# Altium PCB ledcube_v2.PcbDoc (part 7 of 18)
Units mil, origin at the board's own origin, x right, y up, seen from the top; angles counter-clockwise.
Board outline 3130 x 3300 mil, 2 copper layers (Top Layer, Bottom Layer); 188 components, 216 nets, 29515 pads, 250 vias.
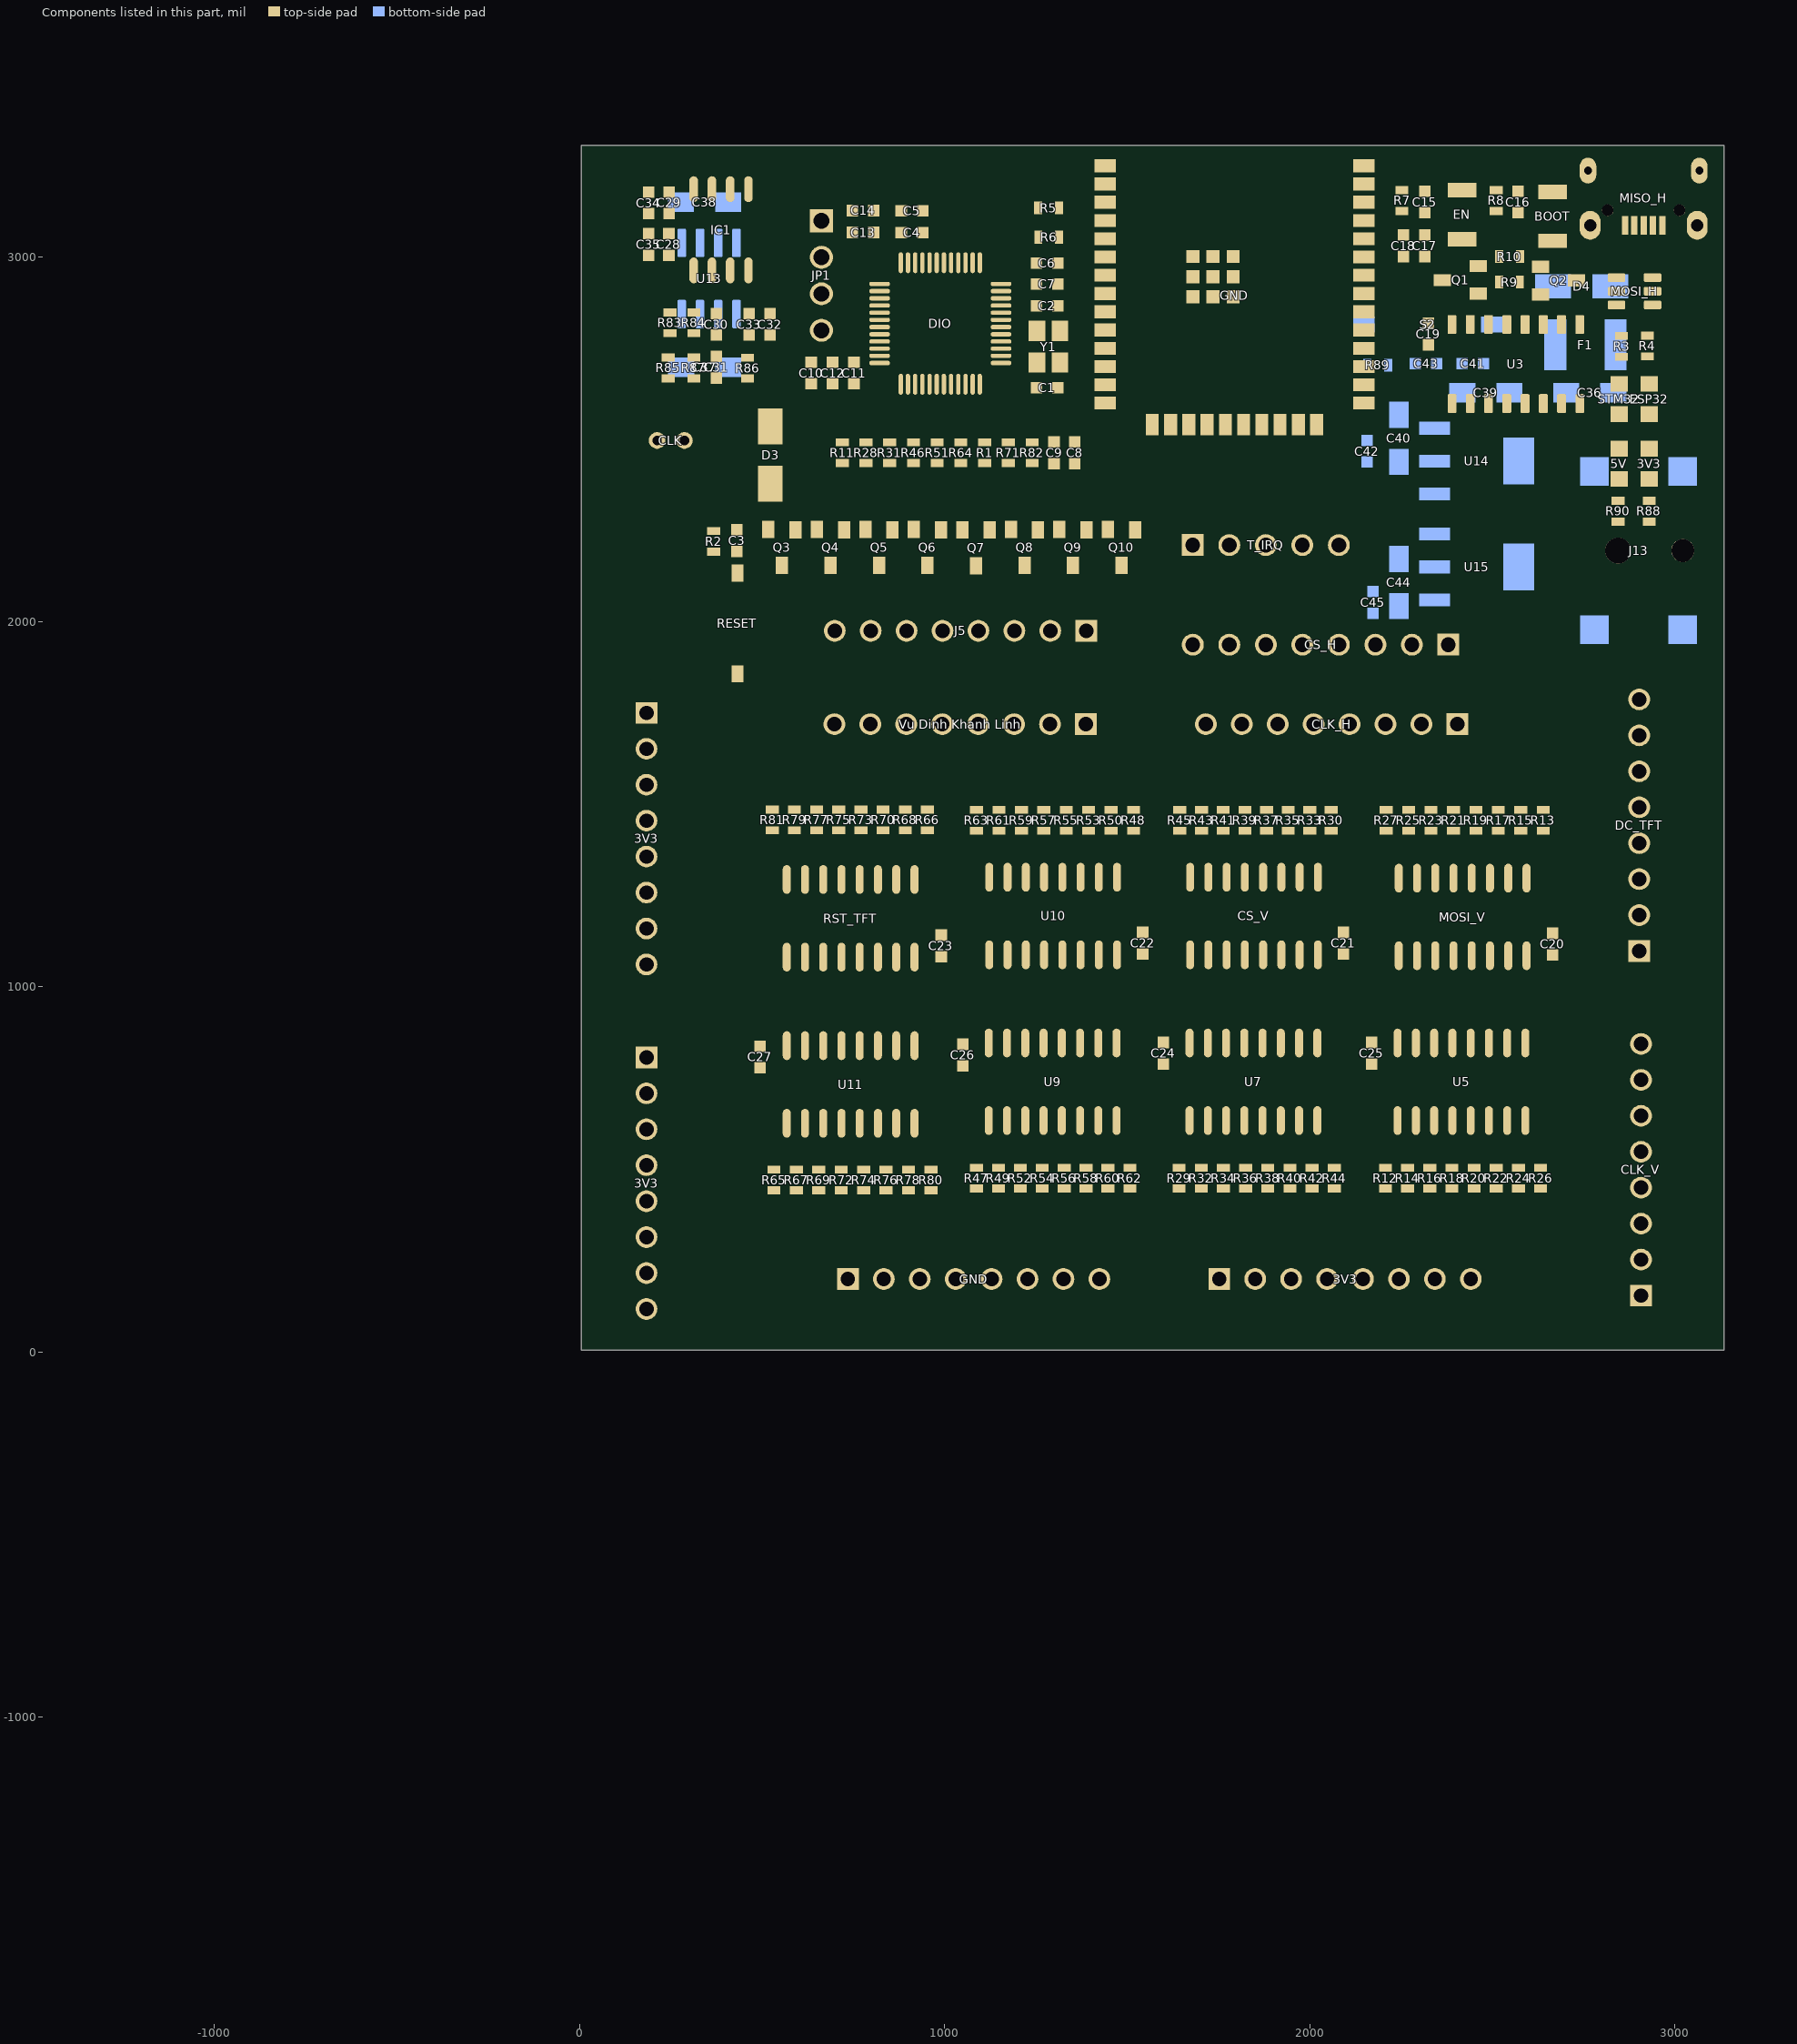
[diagram p6: the components of this part, seen from the top]

## Free pads (board coordinates) (continued)
  round 0.01 on Mech3: 1(-1371.24,-1735.99) 1(-1371.24,-1735.99) 1(-1371.24,-1735.67) 1(-1371.24,-1735.67) 1(-1371.24,-1737.75) 1(-1371.24,-1737.75) 1(-1371.24,-1737.73) 1(-1371.24,-1737.73) 1(-1371.24,-1737.84) 1(-1371.24,-1737.84) 1(-1371.24,-1737.81) 1(-1371.24,-1737.76) 1(-1371.23,-1735.66) 1(-1371.23,-1735.45) 1(-1371.23,-1735.41) 1(-1371.23,-1735.41) 1(-1371.23,-1737.68) 1(-1371.23,-1737.68) 1(-1371.23,-1737.63) 1(-1371.23,-1737.47) 1(-1371.23,-1737.47) 1(-1371.23,-1737.41) 1(-1371.23,-1737.08) 1(-1371.23,-1737.3) 1(-1371.23,-1737.3) 1(-1371.23,-1737.3) 1(-1371.23,-1736.55) 1(-1371.23,-1736.55) 1(-1371.23,-1737.17) 1(-1371.23,-1737.17) 1(-1371.23,-1737.08) 1(-1371.23,-1737.08) 1(-1371.23,-1736.86) 1(-1371.23,-1736.86) 1(-1371.23,-1736.83) 1(-1371.23,-1736.78) 1(-1371.23,-1736.75) 1(-1371.23,-1736.75) 1(-1371.23,-1737.3) 1(-1371.23,-1737.3) 1(-1371.23,-1737.17) 1(-1371.23,-1737.17) 1(-1371.23,-1736.96) 1(-1371.23,-1736.93) 1(-1371.23,-1736.93) 1(-1371.22,-1737.05) 1(-1371.22,-1737.05) 1(-1371.22,-1738.05) 1(-1371.22,-1738.05) 1(-1371.22,-1735.2) 1(-1371.22,-1735.2) 1(-1371.22,-1735.18) 1(-1371.22,-1735.18) 1(-1371.22,-1736.54) 1(-1371.22,-1736.61) 1(-1371.22,-1736.61) 1(-1371.21,-1735.25) 1(-1371.21,-1735.25) 1(-1371.21,-1735.22) 1(-1371.21,-1735.22) 1(-1371.21,-1735.61) 1(-1371.21,-1735.61) 1(-1371.21,-1735.38) 1(-1371.21,-1735.38) 1(-1371.21,-1735.3) 1(-1371.21,-1735.3) 1(-1371.21,-1735.08) 1(-1371.21,-1735.08) 1(-1371.21,-1737.3) 1(-1371.21,-1737.3) 1(-1371.21,-1735.21) 1(-1371.21,-1735.21) 1(-1371.21,-1735.08) 1(-1371.2,-1737.93) 1(-1371.2,-1737.93) 1(-1371.2,-1735.5) 1(-1371.2,-1735.5) 1(-1371.2,-1735.29) 1(-1371.2,-1735.29) 1(-1371.19,-1738.05) 1(-1371.19,-1738.05) 1(-1371.19,-1735.4) 1(-1371.19,-1735.4) 1(-1371.19,-1735.66) 1(-1371.19,-1735.66) 1(-1371.19,-1735.63) 1(-1371.19,-1735.63) 1(-1371.19,-1737.52) 1(-1371.19,-1737.52) 1(-1371.18,-1735.66) 1(-1371.18,-1737.69) 1(-1371.18,-1737.69) 1(-1371.18,-1737.63) 1(-1371.18,-1737.41) 1(-1371.18,-1737.32) 1(-1371.18,-1737.32) 1(-1371.18,-1738.06) 1(-1371.18,-1736.96) 1(-1371.18,-1736.96) 1(-1371.18,-1736.91) 1(-1371.18,-1736.91) 1(-1371.18,-1736.64) 1(-1371.18,-1736.64) 1(-1371.18,-1737.17) 1(-1371.18,-1737.09) 1(-1371.18,-1737.09) 1(-1371.18,-1736.96) 1(-1371.18,-1737.75) 1(-1371.18,-1737.75) 1(-1371.18,-1737.73) 1(-1371.18,-1737.73) 1(-1371.18,-1735.58) 1(-1371.18,-1735.58) 1(-1371.17,-1736.38) 1(-1371.17,-1736.38) 1(-1371.17,-1736.02) 1(-1371.17,-1736.02) 1(-1371.17,-1737.84) 1(-1371.17,-1737.84) 1(-1371.17,-1737.81) 1(-1371.17,-1737.76) 1(-1371.17,-1736.87) 1(-1371.17,-1736.87) 1(-1371.17,-1736.83) 1(-1371.17,-1736.78) 1(-1371.17,-1736.74) 1(-1371.17,-1736.74) 1(-1371.16,-1735.36) 1(-1371.16,-1737.91) 1(-1371.16,-1737.91) 1(-1371.16,-1735.36) 1(-1371.16,-1735.36) 1(-1371.16,-1735.34) 1(-1371.16,-1735.34) 1(-1371.16,-1737.71) 1(-1371.16,-1737.71) 1(-1371.16,-1735.29) 1(-1371.16,-1735.29) 1(-1371.15,-1735.4) 1(-1371.15,-1735.4) 1(-1371.15,-1735.33) 1(-1371.15,-1735.33) 1(-1371.15,-1736.66) 1(-1371.15,-1736.66) 1(-1371.14,-1735.27) 1(-1371.14,-1735.27) 1(-1371.14,-1735.27) 1(-1371.14,-1735.27) 1(-1371.14,-1735.04) 1(-1371.14,-1735.04) 1(-1371.14,-1735.44) 1(-1371.14,-1735.44) 1(-1371.14,-1735.41) 1(-1371.14,-1735.41) 1(-1371.14,-1737.32) 1(-1371.14,-1735.26) 1(-1371.14,-1735.26) 1(-1371.14,-1737.41) 1(-1371.14,-1737.41) 1(-1371.14,-1737.33) 1(-1371.14,-1737.33) 1(-1371.13,-1735.66) 1(-1371.13,-1735.62) 1(-1371.13,-1735.62) 1(-1371.13,-1735.45) 1(-1371.13,-1737.67) 1(-1371.13,-1737.67) 1(-1371.13,-1737.63) 1(-1371.13,-1737.41) 1(-1371.13,-1737.71) 1(-1371.13,-1737.71) 1(-1371.13,-1737.11) 1(-1371.13,-1737.17) 1(-1371.13,-1737.17) 1(-1371.13,-1737.11) 1(-1371.13,-1737.11) 1(-1371.13,-1737.17) 1(-1371.13,-1736.96) 1(-1371.13,-1736.91) 1(-1371.13,-1736.91) 1(-1371.13,-1735.33) 1(-1371.13,-1735.33) 1(-1371.13,-1735.33) 1(-1371.13,-1735.33) 1(-1371.13,-1737.89) 1(-1371.13,-1737.89) 1(-1371.12,-1736.69) 1(-1371.12,-1736.69) 1(-1371.12,-1735.08) 1(-1371.12,-1735.08) 1(-1371.12,-1735.06) 1(-1371.12,-1735.06) 1(-1371.11,-1737.84) 1(-1371.11,-1737.84) 1(-1371.11,-1737.81) 1(-1371.11,-1737.76) 1(-1371.11,-1737.73) 1(-1371.11,-1737.73) 1(-1371.11,-1735.14) 1(-1371.11,-1735.08) 1(-1371.11,-1736.88) 1(-1371.11,-1736.88) 1(-1371.11,-1736.83) 1(-1371.11,-1736.78) 1(-1371.11,-1736.77) 1(-1371.11,-1736.77) 1(-1371.11,-1736.75) 1(-1371.11,-1736.75) 1(-1371.11,-1735.26) 1(-1371.11,-1735.26) 1(-1371.11,-1735.33) 1(-1371.11,-1735.26) 1(-1371.1,-1737.7) 1(-1371.1,-1737.7) 1(-1371.09,-1737.87) 1(-1371.09,-1737.87) 1(-1371.09,-1735.71) 1(-1371.09,-1735.71) 1(-1371.09,-1735.66) 1(-1371.09,-1735.66) 1(-1371.09,-1735.62) 1(-1371.09,-1735.62) 1(-1371.09,-1735.45) 1(-1371.09,-1735.4) 1(-1371.09,-1735.4) 1(-1371.08,-1737.63) 1(-1371.08,-1737.41) 1(-1371.08,-1737.33) 1(-1371.08,-1737.33) 1(-1371.08,-1737.67) 1(-1371.08,-1737.67) 1(-1371.08,-1737.63) 1(-1371.08,-1737.63) 1(-1371.08,-1737.52) 1(-1371.08,-1737.52) 1(-1371.08,-1737.7) 1(-1371.08,-1737.7) 1(-1371.08,-1737.17) 1(-1371.08,-1737.12) 1(-1371.08,-1737.12) 1(-1371.08,-1736.96) 1(-1371.08,-1736.91) 1(-1371.08,-1736.91) 1(-1371.08,-1735.39) 1(-1371.08,-1735.39) 1(-1371.08,-1735.39) 1(-1371.08,-1735.39) 1(-1371.07,-1736.71) 1(-1371.07,-1736.71) 1(-1371.06,-1736.13) 1(-1371.06,-1736.13) 1(-1371.06,-1735.14) 1(-1371.06,-1735.14) 1(-1371.06,-1737.69) 1(-1371.06,-1737.69) 1(-1371.05,-1735.14) 1(-1371.05,-1735.14) 1(-1371.05,-1735.08) 1(-1371.05,-1737.83) 1(-1371.05,-1737.83) 1(-1371.05,-1737.81) 1(-1371.05,-1737.76) 1(-1371.05,-1737.73) 1(-1371.05,-1737.73) 1(-1371.05,-1735.37) 1(-1371.05,-1735.37) 1(-1371.05,-1735.33) 1(-1371.05,-1735.26) 1(-1371.05,-1736.9) 1(-1371.05,-1736.9) 1(-1371.05,-1736.83) 1(-1371.05,-1736.78) 1(-1371.05,-1736.75) 1(-1371.05,-1736.75) 1(-1371.04,-1737.85) 1(-1371.04,-1737.85) 1(-1371.04,-1735.66) 1(-1371.04,-1735.61) 1(-1371.04,-1735.61) 1(-1371.03,-1737.63) 1(-1371.03,-1737.57) 1(-1371.03,-1737.57) 1(-1371.03,-1736.74) 1(-1371.03,-1736.74) 1(-1371.03,-1737.27) 1(-1371.03,-1737.27) 1(-1371.03,-1737.17) 1(-1371.03,-1737.17) 1(-1371.03,-1736.96) 1(-1371.03,-1736.91) 1(-1371.03,-1736.91) 1(-1371.03,-1736.59) 1(-1371.03,-1736.59) 1(-1371.02,-1737.69) 1(-1371.02,-1737.69) 1(-1371.01,-1735.14) 1(-1371.01,-1735.14) 1(-1371,-1735.33) 1(-1371,-1735.33) 1(-1371,-1735.37) 1(-1371,-1735.37) 1(-1371,-1735.57) 1(-1371,-1735.57) 1(-1371,-1735.26) 1(-1371,-1735.26) 1(-1370.99,-1735.29) 1(-1370.99,-1735.29) 1(-1370.99,-1735.27) 1(-1370.99,-1735.27) 1(-1370.99,-1735.36) 1(-1370.99,-1735.36) 1(-1370.99,-1735.34) 1(-1370.99,-1735.34) 1(-1370.99,-1735.29) 1(-1370.99,-1737.81) 1(-1370.99,-1737.76) 1(-1370.99,-1737.72) 1(-1370.99,-1737.72) 1(-1370.99,-1737.03) 1(-1370.99,-1737.03) 1(-1370.99,-1736.83) 1(-1370.99,-1736.78) 1(-1370.98,-1735.7) 1(-1370.98,-1735.7) 1(-1370.98,-1735.66) 1(-1370.97,-1735.2) 1(-1370.97,-1735.2) 1(-1370.97,-1735.17) 1(-1370.97,-1735.17) 1(-1370.97,-1735.71) 1(-1370.97,-1735.71) 1(-1370.97,-1735.24) 1(-1370.97,-1735.24) 1(-1370.97,-1735.22) 1(-1370.97,-1735.22) 1(-1370.96,-1735.08) 1(-1370.96,-1735.08) 1(-1370.96,-1737.85) 1(-1370.96,-1737.85) 1(-1370.96,-1735.21) 1(-1370.96,-1737.17) 1(-1370.96,-1737.17) 1(-1370.96,-1735.21) 1(-1370.96,-1737.81) 1(-1370.96,-1737.81) 1(-1370.96,-1737.17) 1(-1370.96,-1737.17) 1(-1370.96,-1737.11) 1(-1370.96,-1737.22) 1(-1370.96,-1737.17) 1(-1370.96,-1737.17) 1(-1370.95,-1735.07) 1(-1370.95,-1735.07) 1(-1370.95,-1735.31) 1(-1370.95,-1735.31) 1(-1370.95,-1735.27) 1(-1370.95,-1735.27) 1(-1370.95,-1737.87) 1(-1370.95,-1737.87) 1(-1370.94,-1736.78) 1(-1370.94,-1736.78) 1(-1370.94,-1736.74) 1(-1370.94,-1736.74) 1(-1370.93,-1737.11) 1(-1370.93,-1737.11) 1(-1370.93,-1735.33) 1(-1370.93,-1735.33) 1(-1370.92,-1735.57) 1(-1370.92,-1735.57) 1(-1370.92,-1736.71) 1(-1370.92,-1736.71) 1(-1370.91,-1736.47) 1(-1370.91,-1736.47) 1(-1370.9,-1735.31) 1(-1370.9,-1735.31) 1(-1370.9,-1735.25) 1(-1370.9,-1736.69) 1(-1370.9,-1736.69) 1(-1370.9,-1737.89) 1(-1370.9,-1737.89) 1(-1370.89,-1735.33) 1(-1370.89,-1735.33) 1(-1370.88,-1735.71) 1(-1370.88,-1735.71) 1(-1370.88,-1737.98) 1(-1370.88,-1737.98) 1(-1370.87,-1737.09) 1(-1370.87,-1737.09) 1(-1370.87,-1736.85) 1(-1370.87,-1736.85) 1(-1370.87,-1737.72) 1(-1370.87,-1737.72) 1(-1370.87,-1737.57) 1(-1370.87,-1737.57) 1(-1370.86,-1735.14) 1(-1370.86,-1735.14) 1(-1370.86,-1735.07) 1(-1370.86,-1735.07) 1(-1370.86,-1735.07) 1(-1370.86,-1735.02) 1(-1370.86,-1735.02) 1(-1370.86,-1735.17) 1(-1370.86,-1735.17) 1(-1370.86,-1735.14) 1(-1370.86,-1735.14) 1(-1370.86,-1735.17) 1(-1370.86,-1735.17) 1(-1370.86,-1735.17) 1(-1370.86,-1735.17) 1(-1370.84,-1737.72) 1(-1370.84,-1737.72) 1(-1370.84,-1737.63) 1(-1370.84,-1737.63) 1(-1370.83,-1737.91) 1(-1370.83,-1737.91) 1(-1370.83,-1735.47) 1(-1370.83,-1735.47) 1(-1370.83,-1735.33) 1(-1370.83,-1735.33) 1(-1370.83,-1736.66) 1(-1370.83,-1736.66) 1(-1370.83,-1735.66) 1(-1370.83,-1735.66) 1(-1370.83,-1735.53) 1(-1370.83,-1735.53) 1(-1370.82,-1735.32) 1(-1370.82,-1735.32) 1(-1370.82,-1737.01) 1(-1370.82,-1737.01) 1(-1370.82,-1736.86) 1(-1370.82,-1736.86) 1(-1370.81,-1735.51) 1(-1370.81,-1735.51) 1(-1370.81,-1735.4) 1(-1370.81,-1735.4) 1(-1370.8,-1735.4) 1(-1370.8,-1735.4) 1(-1370.8,-1735.4) 1(-1370.8,-1735.4) 1(-1370.8,-1735.39) 1(-1370.8,-1735.39) 1(-1370.8,-1737.16) 1(-1370.8,-1737.16) 1(-1370.78,-1735.39) 1(-1370.78,-1735.36) 1(-1370.78,-1735.32) 1(-1370.78,-1735.35) 1(-1370.78,-1735.35) 1(-1370.78,-1735.99) 1(-1370.78,-1735.93) 1(-1370.78,-1735.87) 1(-1370.78,-1735.93) 1(-1370.78,-1735.93) 1(-1370.78,-1735.87) 1(-1370.78,-1735.79) 1(-1370.78,-1735.69) 1(-1370.78,-1735.69) 1(-1370.78,-1735.61) 1(-1370.78,-1735.54) 1(-1370.78,-1735.54) 1(-1370.77,-1736.91) 1(-1370.77,-1736.91) 1(-1370.77,-1736.86) 1(-1370.77,-1736.86) 1(-1370.77,-1735.53) 1(-1370.77,-1735.53) 1(-1370.77,-1735.53) 1(-1370.77,-1735.48) 1(-1370.77,-1735.48) 1(-1370.77,-1735.48) 1(-1370.77,-1735.45) 1(-1370.77,-1735.45) 1(-1370.77,-1737.95) 1(-1370.77,-1737.95) 1(-1370.77,-1737.06) 1(-1370.77,-1737.06) 1(-1370.77,-1736.61) 1(-1370.77,-1736.61) 1(-1370.77,-1737.28) 1(-1370.77,-1737.28) 1(-1370.76,-1735.28) 1(-1370.76,-1735.28) 1(-1370.76,-1735.17) 1(-1370.76,-1735.17) 1(-1370.76,-1736.64) 1(-1370.76,-1736.64) 1(-1370.76,-1738.11) 1(-1370.76,-1738.11) 1(-1370.76,-1736.13) 1(-1370.76,-1736.13) 1(-1370.75,-1735.35) 1(-1370.75,-1735.35) 1(-1370.75,-1737.93) 1(-1370.75,-1737.93) 1(-1370.74,-1735.35) 1(-1370.74,-1735.35) 1(-1370.74,-1735.3) 1(-1370.74,-1735.3) 1(-1370.74,-1735.42) 1(-1370.74,-1735.42) 1(-1370.73,-1737.81) 1(-1370.73,-1737.81) 1(-1370.73,-1736.67) 1(-1370.73,-1736.67) 1(-1370.73,-1737.91) 1(-1370.73,-1737.91) 1(-1370.73,-1737.65) 1(-1370.73,-1737.65) 1(-1370.73,-1737.62) 1(-1370.73,-1737.62) 1(-1370.72,-1735.34) 1(-1370.72,-1735.34) 1(-1370.72,-1735.28) 1(-1370.72,-1737.16) 1(-1370.72,-1737.06) 1(-1370.72,-1736.96) 1(-1370.72,-1736.87) 1(-1370.72,-1736.77) 1(-1370.72,-1736.77) 1(-1370.72,-1736.77) 1(-1370.72,-1736.67) 1(-1370.72,-1736.57) 1(-1370.72,-1736.47) 1(-1370.72,-1735.35) 1(-1370.72,-1735.35) 1(-1370.72,-1738.11) 1(-1370.72,-1738.01) 1(-1370.72,-1737.91) 1(-1370.72,-1737.81) 1(-1370.72,-1737.71) 1(-1370.72,-1737.61) 1(-1370.72,-1737.51) 1(-1370.72,-1737.42) 1(-1370.71,-1735.23) 1(-1370.71,-1735.23) 1(-1370.71,-1735.17) 1(-1370.7,-1735.6) 1(-1370.7,-1735.6) 1(-1370.7,-1735.53) 1(-1370.7,-1735.48) 1(-1370.7,-1735.45) 1(-1370.7,-1735.45) 1(-1370.69,-1736.08) 1(-1370.69,-1736.08) 1(-1370.69,-1735.99) 1(-1370.69,-1735.93) 1(-1370.69,-1735.87) 1(-1370.69,-1735.79) 1(-1370.69,-1735.69) 1(-1370.69,-1735.69) 1(-1370.69,-1735.69) 1(-1370.69,-1735.61) 1(-1370.69,-1735.44) 1(-1370.69,-1735.44) 1(-1370.69,-1735.35) 1(-1370.69,-1735.35) 1(-1370.69,-1735.39) 1(-1370.69,-1735.36) 1(-1370.69,-1735.32) 1(-1370.69,-1735.26) 1(-1370.69,-1735.26) 1(-1370.68,-1735.22) 1(-1370.68,-1735.22) 1(-1370.68,-1735.17) 1(-1370.68,-1735.39) 1(-1370.68,-1735.39) 1(-1370.66,-1735.23) 1(-1370.66,-1735.23) 1(-1370.66,-1735.17) 1(-1370.65,-1735.39) 1(-1370.65,-1735.39) 1(-1370.65,-1735.42) 1(-1370.65,-1735.42) 1(-1370.64,-1737.28) 1(-1370.64,-1737.28) 1(-1370.64,-1735.38) 1(-1370.64,-1735.38) 1(-1370.64,-1735.27) 1(-1370.64,-1735.27) 1(-1370.62,-1735.34) 1(-1370.61,-1735.33) 1(-1370.61,-1735.33) 1(-1370.61,-1735.27) 1(-1370.61,-1735.27) 1(-1370.61,-1735.44) 1(-1370.61,-1735.44) 1(-1370.56,-1735.17) 1(-1370.56,-1735.17) 1(-1370.56,-1735.17) 1(-1370.56,-1735.17) 1(-1370.56,-1735.03) 1(-1370.56,-1735.03) 1(-1370.56,-1735.34) 1(-1370.56,-1735.34) 1(-1370.56,-1735.34) 1(-1370.56,-1735.29) 1(-1370.56,-1735.02) 1(-1370.56,-1735.02) 1(-1370.56,-1735.29) 1(-1370.56,-1735.29) 1(-1370.54,-1735.37) 1(-1370.54,-1735.37) 1(-1370.54,-1735.31) 1(-1370.54,-1735.31) 1(-1370.51,-1737.15) 1(-1370.51,-1737.15) 1(-1370.51,-1735.69) 1(-1370.51,-1735.69) 1(-1370.51,-1735.69) 1(-1370.51,-1735.69) 1(-1370.51,-1735.69) 1(-1370.51,-1735.18) 1(-1370.51,-1735.18)
  round 0.01 on Mech2: 1(-1373.49,-1735.26) 1(-1373.43,-1735.59) 1(-1373.43,-1735.26) 1(-1373.43,-1735.26) 1(-1373.43,-1735.26) 1(-1373.43,-1735.05) 1(-1373.43,-1735.05) 1(-1373.41,-1735.76) 1(-1373.39,-1735.34) 1(-1373.38,-1736.13) 1(-1373.38,-1736.13) 1(-1373.38,-1736.06) 1(-1373.38,-1736.06) 1(-1373.38,-1736.05) 1(-1373.38,-1736.05) 1(-1373.38,-1735.98) 1(-1373.38,-1735.98) 1(-1373.38,-1735.97) 1(-1373.38,-1735.97) 1(-1373.38,-1735.93) 1(-1373.38,-1735.93) 1(-1373.38,-1735.97) 1(-1373.38,-1735.97) 1(-1373.38,-1734.99) 1(-1373.38,-1734.99) 1(-1373.35,-1735.22) 1(-1373.35,-1735.22) 1(-1373.35,-1735.11) 1(-1373.35,-1735.11) 1(-1373.35,-1735.06) 1(-1373.35,-1735.06) 1(-1373.35,-1735.56) 1(-1373.35,-1735.43) 1(-1373.35,-1735.22) 1(-1373.32,-1736.07) 1(-1373.32,-1736.02) 1(-1373.3,-1735.52) 1(-1373.3,-1735.52) 1(-1373.3,-1735.42) 1(-1373.3,-1735.42) 1(-1373.3,-1735.34) 1(-1373.3,-1735.34) 1(-1373.3,-1735.34) 1(-1373.3,-1735.34) 1(-1373.3,-1735.22) 1(-1373.3,-1735.22) 1(-1373.3,-1735.15) 1(-1373.3,-1735.15) 1(-1373.29,-1735.64) 1(-1373.29,-1735.64) 1(-1373.29,-1735.53) 1(-1373.29,-1735.53) 1(-1373.27,-1735.12) 1(-1373.27,-1735.12) 1(-1373.26,-1735.34) 1(-1373.26,-1735.34) 1(-1373.24,-1735.48) 1(-1373.24,-1735.48) 1(-1373.24,-1735.42) 1(-1373.24,-1735.36) 1(-1373.24,-1735.36) 1(-1373.24,-1735.36) 1(-1373.22,-1735.11) 1(-1373.2,-1735.76) 1(-1373.2,-1735.76) 1(-1373.2,-1735.31) 1(-1373.2,-1735.31) 1(-1373.2,-1735.22) 1(-1373.2,-1735.22) 1(-1373.19,-1735.22) 1(-1373.19,-1735.22) 1(-1373.18,-1735.76) 1(-1373.18,-1735.76) 1(-1373.16,-1735.87) 1(-1373.16,-1735.87) 1(-1373.16,-1735.86) 1(-1373.16,-1735.86) 1(-1373.16,-1735.02) 1(-1373.16,-1735.02) 1(-1373.13,-1736.07) 1(-1373.13,-1736.07) 1(-1373.13,-1735.22) 1(-1373.13,-1735.22) 1(-1373.11,-1734.99) 1(-1373.11,-1734.99) 1(-1373.09,-1735.79) 1(-1373.09,-1735.79) 1(-1373.09,-1735.66) 1(-1373.09,-1735.66) 1(-1373.09,-1735.42) 1(-1373.09,-1735.42) 1(-1373.08,-1735.17) 1(-1373.08,-1735.17) 1(-1373.08,-1735.02) 1(-1373.08,-1735.02) 1(-1373.05,-1736.46) 1(-1373.05,-1736.46) 1(-1373.04,-1735.79) 1(-1373.04,-1735.79) 1(-1373.01,-1737.31) 1(-1373.01,-1737.31) 1(-1373.01,-1737.27) 1(-1373.01,-1737.27) 1(-1373.01,-1737.27) 1(-1373.01,-1737.27) 1(-1373.01,-1737.25) 1(-1373.01,-1737.25) 1(-1372.98,-1737.22) 1(-1372.98,-1737.22) 1(-1372.96,-1735.36) 1(-1372.96,-1735.26) 1(-1372.96,-1737.36) 1(-1372.96,-1737.36) 1(-1372.96,-1737.27) 1(-1372.96,-1735.27) 1(-1372.96,-1735.27) 1(-1372.92,-1735.27) 1(-1372.92,-1735.27) 1(-1372.91,-1735.36) 1(-1372.91,-1735.36) 1(-1372.81,-1737.33) 1(-1372.81,-1737.33) 1(-1372.81,-1737.27) 1(-1372.81,-1737.27) 1(-1372.81,-1737.27) 1(-1372.81,-1737.27) 1(-1372.81,-1737.27) 1(-1372.78,-1735.66) 1(-1372.78,-1735.13) 1(-1372.72,-1735.55) 1(-1372.69,-1735.57) 1(-1372.69,-1735.57) 1(-1372.69,-1735.5) 1(-1372.69,-1735.5) 1(-1372.67,-1735.61) 1(-1372.67,-1735.61) 1(-1372.67,-1735.18) 1(-1372.67,-1735.18) 1(-1372.65,-1735.16) 1(-1372.65,-1735.16) 1(-1372.64,-1735.78) 1(-1372.64,-1735.78) 1(-1372.64,-1735.22) 1(-1372.64,-1735.13) 1(-1372.64,-1737.22) 1(-1372.64,-1737.22) 1(-1372.61,-1735.16) 1(-1372.61,-1735.16) 1(-1372.59,-1735.41) 1(-1372.59,-1735.41) 1(-1372.59,-1735.18) 1(-1372.59,-1735.18) 1(-1372.58,-1737.36) 1(-1372.58,-1737.36) 1(-1372.57,-1735.2) 1(-1372.57,-1735.2) 1(-1372.57,-1735.18) 1(-1372.57,-1735.18) 1(-1372.57,-1735.2) 1(-1372.57,-1735.43) 1(-1372.56,-1735.16) 1(-1372.56,-1735.16) 1(-1372.54,-1735.83) 1(-1372.54,-1735.83) 1(-1372.54,-1735.44) 1(-1372.54,-1735.44) 1(-1372.53,-1735.43) 1(-1372.53,-1735.43) 1(-1372.53,-1735.2) 1(-1372.52,-1735.8) 1(-1372.52,-1735.8) 1(-1372.52,-1735.45) 1(-1372.52,-1735.45) 1(-1372.51,-1735.16) 1(-1372.51,-1735.16) 1(-1372.5,-1735.43) 1(-1372.5,-1735.43) 1(-1372.5,-1735.17) 1(-1372.5,-1735.17) 1(-1372.47,-1735.65) 1(-1372.47,-1735.65) 1(-1372.47,-1735.36) 1(-1372.44,-1735.62) 1(-1372.44,-1735.62) 1(-1372.44,-1735.62) 1(-1372.43,-1735.62) 1(-1372.43,-1735.62) 1(-1372.42,-1735.6) 1(-1372.42,-1735.6) 1(-1372.42,-1735.4) 1(-1372.42,-1735.4) 1(-1372.41,-1735.28) 1(-1372.41,-1735.28) 1(-1372.41,-1735.28) 1(-1372.41,-1735.15) 1(-1372.41,-1735.15) 1(-1372.4,-1737.27) 1(-1372.37,-1735.08) 1(-1372.35,-1735.91) 1(-1372.35,-1735.91) 1(-1372.35,-1735.82) 1(-1372.35,-1735.82) 1(-1372.35,-1735.72) 1(-1372.35,-1735.72) 1(-1372.35,-1735.74) 1(-1372.35,-1735.74) 1(-1372.35,-1735.73) 1(-1372.35,-1735.73) 1(-1372.34,-1735.04) 1(-1372.34,-1735.04) 1(-1372.34,-1735.28) 1(-1372.34,-1735.28) 1(-1372.32,-1735.89) 1(-1372.32,-1735.89) 1(-1372.32,-1735.5) 1(-1372.32,-1735.5) 1(-1372.28,-1735.88) 1(-1372.28,-1735.88) 1(-1372.28,-1735.51) 1(-1372.28,-1735.51) 1(-1372.27,-1735.34) 1(-1372.26,-1735.86) 1(-1372.26,-1735.86) 1(-1372.26,-1735.53) 1(-1372.26,-1735.53) 1(-1372.24,-1735.42) 1(-1372.24,-1735.42) 1(-1372.24,-1735.51) 1(-1372.24,-1735.46) 1(-1372.24,-1735.42) 1(-1372.23,-1735.25) 1(-1372.22,-1735.34) 1(-1372.22,-1735.34) 1(-1372.19,-1735.87) 1(-1372.19,-1735.87) 1(-1372.19,-1735.62) 1(-1372.19,-1735.62) 1(-1372.18,-1736.82) 1(-1372.18,-1736.82) 1(-1372.18,-1736.46) 1(-1372.18,-1736.46) 1(-1372.14,-1735.04) 1(-1372.13,-1736.71) 1(-1372.13,-1736.71) 1(-1372.13,-1736.29) 1(-1372.13,-1736.29) 1(-1372.12,-1735.88) 1(-1372.12,-1735.88) 1(-1372.12,-1735.61) 1(-1372.12,-1735.56) 1(-1372.11,-1736.58) 1(-1372.11,-1736.58) 1(-1372.11,-1736.26) 1(-1372.11,-1736.26) 1(-1372.11,-1735.21) 1(-1372.09,-1735.73) 1(-1372.09,-1735.73) 1(-1372.09,-1735.25) 1(-1372.09,-1735.25) 1(-1372.09,-1735.25) 1(-1372.09,-1735.25) 1(-1372.08,-1737.22) 1(-1372.08,-1737.22) 1(-1372.08,-1737.22) 1(-1372.08,-1736.92) 1(-1372.08,-1736.92) 1(-1372.08,-1736.47) 1(-1372.08,-1736.47) 1(-1372.08,-1736.23) 1(-1372.08,-1736.23) 1(-1372.08,-1735.24) 1(-1372.08,-1735.24) 1(-1372.07,-1735.05) 1(-1372.07,-1735.05) 1(-1372.06,-1735.08) 1(-1372.06,-1735.08) 1(-1372.05,-1736.38) 1(-1372.05,-1736.38) 1(-1372.05,-1736.38) 1(-1372.03,-1737.36) 1(-1372.03,-1737.36) 1(-1372.02,-1736.34) 1(-1372.02,-1736.34) 1(-1372.02,-1736.19) 1(-1372.02,-1736.19) 1(-1372.01,-1736.1) 1(-1372.01,-1736.1) 1(-1372.01,-1736.05) 1(-1372.01,-1736.05) 1(-1372.01,-1735.99) 1(-1372.01,-1735.99) 1(-1372.01,-1735.73) 1(-1372.01,-1735.73) 1(-1372.01,-1735.27) 1(-1372.01,-1735.27) 1(-1372.01,-1736.15) 1(-1372.01,-1736.15) 1(-1371.96,-1735.78) 1(-1371.96,-1735.78) 1(-1371.96,-1735.78) 1(-1371.95,-1735.12) 1(-1371.95,-1735.12) 1(-1371.94,-1736.34) 1(-1371.94,-1736.34) 1(-1371.94,-1736.32) 1(-1371.94,-1736.05) 1(-1371.94,-1735.12) 1(-1371.94,-1735.12) 1(-1371.93,-1736.41) 1(-1371.93,-1736.41) 1(-1371.92,-1735.1) 1(-1371.92,-1735.1) 1(-1371.92,-1735.1) 1(-1371.91,-1736.37) 1(-1371.91,-1736.37) 1(-1371.9,-1735.8) 1(-1371.9,-1735.54) 1(-1371.9,-1735.54) 1(-1371.89,-1735.14) 1(-1371.89,-1735.14) 1(-1371.85,-1735.97) 1(-1371.85,-1735.97) 1(-1371.75,-1736.15) 1(-1371.75,-1736.15) 1(-1371.74,-1737.11) 1(-1371.74,-1737.11) 1(-1371.73,-1735.52) 1(-1371.7,-1737.32) 1(-1371.7,-1737.32) 1(-1371.69,-1736.1) 1(-1371.69,-1736.1) 1(-1371.67,-1737.01) 1(-1371.67,-1737.01) 1(-1371.67,-1736.88) 1(-1371.67,-1736.88) 1(-1371.64,-1736.32) 1(-1371.64,-1736.26) 1(-1371.64,-1736.26) 1(-1371.64,-1736.05) 1(-1371.64,-1735.52) 1(-1371.62,-1736.37) 1(-1371.62,-1736.37) 1(-1371.62,-1735.25) 1(-1371.62,-1735.25) 1(-1371.62,-1736.41) 1(-1371.62,-1736.41) 1(-1371.61,-1735.99) 1(-1371.61,-1735.99) 1(-1371.6,-1736.34) 1(-1371.6,-1736.34) 1(-1371.6,-1736.3) 1(-1371.6,-1736.3) 1(-1371.57,-1736.27) 1(-1371.57,-1736.27) 1(-1371.57,-1735.84) 1(-1371.57,-1735.84) 1(-1371.57,-1735.77) 1(-1371.57,-1735.77) 1(-1371.56,-1735.97) 1(-1371.56,-1735.97) 1(-1371.56,-1736.05) 1(-1371.56,-1736.05) 1(-1371.55,-1736.35) 1(-1371.55,-1736.35) 1(-1371.55,-1736.33) 1(-1371.55,-1736.33) 1(-1371.55,-1736.32) 1(-1371.55,-1736.05) 1(-1371.54,-1735.98) 1(-1371.54,-1735.98) 1(-1371.54,-1735.98) 1(-1371.54,-1735.98) 1(-1371.54,-1737.22) 1(-1371.54,-1737.22) 1(-1371.54,-1735.8) 1(-1371.54,-1735.7) 1(-1371.54,-1735.44) 1(-1371.54,-1735.44) 1(-1371.54,-1737.22) 1(-1371.54,-1737.22) 1(-1371.54,-1735.88) 1(-1371.54,-1735.88) 1(-1371.53,-1737.22) 1(-1371.53,-1737.22) 1(-1371.52,-1735.88) 1(-1371.52,-1735.88) 1(-1371.52,-1736.27) 1(-1371.52,-1736.27) 1(-1371.51,-1735.72) 1(-1371.51,-1735.72) 1(-1371.51,-1735.58) 1(-1371.51,-1735.58) 1(-1371.51,-1735.77) 1(-1371.51,-1735.77) 1(-1371.51,-1735.4) 1(-1371.51,-1735.4) 1(-1371.49,-1736.45) 1(-1371.49,-1736.45) 1(-1371.49,-1736.45) 1(-1371.49,-1736.3) 1(-1371.49,-1736.3) 1(-1371.49,-1736.26) 1(-1371.49,-1736.26) 1(-1371.49,-1736.03) 1(-1371.49,-1736.03) 1(-1371.49,-1735.88) 1(-1371.48,-1735.45) 1(-1371.48,-1735.45) 1(-1371.48,-1735.45) 1(-1371.47,-1735.77) 1(-1371.47,-1735.77) 1(-1371.47,-1735.82) 1(-1371.47,-1735.82) 1(-1371.47,-1735.76) 1(-1371.47,-1735.76) 1(-1371.47,-1735.73) 1(-1371.47,-1735.73) 1(-1371.47,-1735.82) 1(-1371.47,-1735.82) 1(-1371.47,-1735.91) 1(-1371.47,-1735.91) 1(-1371.47,-1735.88) 1(-1371.47,-1735.88) 1(-1371.47,-1735.88) 1(-1371.47,-1735.82) 1(-1371.47,-1735.82) 1(-1371.46,-1737.36) 1(-1371.45,-1736.24) 1(-1371.45,-1736.18) 1(-1371.45,-1736.11) 1(-1371.45,-1736.11) 1(-1371.44,-1736.32) 1(-1371.44,-1736.31) 1(-1371.44,-1736.31) 1(-1371.44,-1735.4) 1(-1371.44,-1735.4) 1(-1371.44,-1735.45) 1(-1371.44,-1735.45) 1(-1371.43,-1736.09) 1(-1371.43,-1736.09) 1(-1371.43,-1735.08) 1(-1371.43,-1735.08) 1(-1371.43,-1735.07) 1(-1371.43,-1735.07) 1(-1371.43,-1735.69) 1(-1371.43,-1735.69) 1(-1371.42,-1735.07) 1(-1371.42,-1735.02) 1(-1371.41,-1735.56) 1(-1371.41,-1735.55) 1(-1371.41,-1735.47) 1(-1371.41,-1735.47) 1(-1371.41,-1735.55) 1(-1371.41,-1735.55) 1(-1371.4,-1735.44) 1(-1371.4,-1735.44) 1(-1371.4,-1736.24) 1(-1371.4,-1736.24) 1(-1371.38,-1735.69) 1(-1371.38,-1735.69) 1(-1371.38,-1735.82) 1(-1371.38,-1735.82) 1(-1371.38,-1736.09) 1(-1371.38,-1736.09) 1(-1371.38,-1735.82) 1(-1371.38,-1735.82) 1(-1371.38,-1735.7) 1(-1371.38,-1735.7) 1(-1371.38,-1735.69) 1(-1371.38,-1735.69) 1(-1371.38,-1736.22) 1(-1371.38,-1736.22) 1(-1371.38,-1736.1) 1(-1371.38,-1736.1) 1(-1371.38,-1736.09) 1(-1371.38,-1736.09) 1(-1371.38,-1736.22) 1(-1371.38,-1736.22) 1(-1371.38,-1736.22) 1(-1371.38,-1736.16) 1(-1371.38,-1735.82) 1(-1371.38,-1735.82) 1(-1371.37,-1736.11) 1(-1371.37,-1736.11) 1(-1371.36,-1736.2) 1(-1371.36,-1736.2) 1(-1371.36,-1736.02) 1(-1371.36,-1736.02) 1(-1371.36,-1735.17) 1(-1371.35,-1735.14) 1(-1371.35,-1735.14) 1(-1371.35,-1735.75) 1(-1371.35,-1735.75) 1(-1371.35,-1735.73) 1(-1371.35,-1735.73) 1(-1371.34,-1735.15) 1(-1371.34,-1735.15) 1(-1371.34,-1735.55) 1(-1371.34,-1735.44) 1(-1371.32,-1736.45) 1(-1371.32,-1736.45) 1(-1371.32,-1735.78) 1(-1371.32,-1735.78) 1(-1371.32,-1735.05) 1(-1371.32,-1735.05) 1(-1371.31,-1735.22) 1(-1371.31,-1735.22) 1(-1371.3,-1737.01) 1(-1371.3,-1737.01) 1(-1371.29,-1736.11) 1(-1371.29,-1736.11) 1(-1371.28,-1735.82) 1(-1371.28,-1735.82) 1(-1371.28,-1736.2) 1(-1371.28,-1736.11) 1(-1371.28,-1736.11) 1(-1371.28,-1736.02) 1(-1371.28,-1735.91) 1(-1371.28,-1735.82) 1(-1371.28,-1735.82) 1(-1371.28,-1735.73) 1(-1371.28,-1735.66) 1(-1371.28,-1735.66) 1(-1371.28,-1736.02) 1(-1371.28,-1736.02) 1(-1371.28,-1735.91) 1(-1371.28,-1735.91) 1(-1371.28,-1737.27) 1(-1371.28,-1735.08) 1(-1371.28,-1735.08) 1(-1371.28,-1735.55) 1(-1371.28,-1735.51) 1(-1371.28,-1735.51) 1(-1371.26,-1735.63) 1(-1371.26,-1735.63) 1(-1371.24,-1736.38) 1(-1371.24,-1736.38) 1(-1371.24,-1736.36) 1(-1371.24,-1736.36) 1(-1371.24,-1736.32) 1(-1371.24,-1736.32) 1(-1371.23,-1737.08) 1(-1371.21,-1735.15) 1(-1371.21,-1735.15) 1(-1371.21,-1735.14) 1(-1371.21,-1735.14) 1(-1371.21,-1735.63) 1(-1371.21,-1735.63) 1(-1371.21,-1735.55) 1(-1371.21,-1735.55) 1(-1371.21,-1735.63) 1(-1371.21,-1735.63) 1(-1371.21,-1735.63) 1(-1371.21,-1735.55) 1(-1371.21,-1735.55) 1(-1371.21,-1735.63) 1(-1371.21,-1735.55) 1(-1371.21,-1735.55) 1(-1371.21,-1735.53) 1(-1371.21,-1735.53) 1(-1371.2,-1735.91) 1(-1371.2,-1735.91) 1(-1371.18,-1735.5) 1(-1371.18,-1735.5) 1(-1371.17,-1736.02) 1(-1371.16,-1735.78) 1(-1371.16,-1735.78) 1(-1371.15,-1735.55) 1(-1371.15,-1736.32) 1(-1371.15,-1736.32) 1(-1371.14,-1737.32) 1(-1371.14,-1737.32) 1(-1371.13,-1737.11) 1(-1371.12,-1735.91) 1(-1371.12,-1735.91) 1(-1371.1,-1735.55) 1(-1371.1,-1735.55) 1(-1371.09,-1735.14) 1(-1371.09,-1735.14) 1(-1371.08,-1735.69) 1(-1371.08,-1735.69) 1(-1371.08,-1735.63) 1(-1371.08,-1735.63) 1(-1371.08,-1735.63) 1(-1371.08,-1735.63) 1(-1371.08,-1735.63) 1(-1371.08,-1735.58) 1(-1371.08,-1735.58) 1(-1371.08,-1735.15) 1(-1371.08,-1735.15) 1(-1371.05,-1736.23) 1(-1371.05,-1736.23) 1(-1371.05,-1736.11) 1(-1371.05,-1736.11) 1(-1371.05,-1735.93) 1(-1371.05,-1735.93) 1(-1371.05,-1735.82) 1(-1371.05,-1735.82) 1(-1371.03,-1735.28) 1(-1371.03,-1735.28) 1(-1371.01,-1736.88) 1(-1371.01,-1736.88) 1(-1370.99,-1735.98) 1(-1370.99,-1735.98) 1(-1370.99,-1737.32) 1(-1370.99,-1737.32) 1(-1370.96,-1735.15) 1(-1370.96,-1735.15) 1(-1370.96,-1735.34) 1(-1370.96,-1737.22) 1(-1370.95,-1735.5) 1(-1370.95,-1735.5) 1(-1370.95,-1735.35) 1(-1370.95,-1735.35) 1(-1370.92,-1735.63) 1(-1370.92,-1735.63) 1(-1370.9,-1737.24) 1(-1370.9,-1737.24) 1(-1370.9,-1736.98) 1(-1370.9,-1736.98) 1(-1370.9,-1735.25) 1(-1370.9,-1735.61) 1(-1370.9,-1735.61) 1(-1370.9,-1735.1) 1(-1370.9,-1735.1) 1(-1370.89,-1735.22) 1(-1370.89,-1735.22) 1(-1370.88,-1735.61) 1(-1370.88,-1735.61) 1(-1370.87,-1735.61) 1(-1370.87,-1735.61) 1(-1370.87,-1735.35) 1(-1370.87,-1735.35) 1(-1370.86,-1735.34) 1(-1370.86,-1735.34) 1(-1370.85,-1735.84) 1(-1370.85,-1735.84) 1(-1370.85,-1735.75) 1(-1370.85,-1735.75) 1(-1370.84,-1736.29) 1(-1370.84,-1736.29) 1(-1370.84,-1736.29) 1(-1370.84,-1736.29) 1(-1370.84,-1736.19) 1(-1370.84,-1736.19) 1(-1370.84,-1735.84) 1(-1370.84,-1735.84) 1(-1370.84,-1735.23) 1(-1370.84,-1735.23) 1(-1370.8,-1735.34) 1(-1370.79,-1735.7) 1(-1370.79,-1735.7) 1(-1370.79,-1735.63) 1(-1370.79,-1735.63) 1(-1370.79,-1735.63) 1(-1370.79,-1735.63) 1(-1370.79,-1735.5) 1(-1370.79,-1735.5) 1(-1370.79,-1735.5) 1(-1370.73,-1735.1) 1(-1370.73,-1735.1) 1(-1370.72,-1735.28) 1(-1370.72,-1735.28) 1(-1370.67,-1735.28) 1(-1370.67,-1735.28) 1(-1370.65,-1735.23) 1(-1370.65,-1735.23) 1(-1370.65,-1735.23) 1(-1370.65,-1735.23) 1(-1370.65,-1735.18) 1(-1370.65,-1735.18) 1(-1370.65,-1735.18) 1(-1370.65,-1735.18) 1(-1370.62,-1735.34) 1(-1370.6,-1736.29) 1(-1370.6,-1735.84) 1(-1370.59,-1735.98) 1(-1370.59,-1735.98) 1(-1370.58,-1735.43) 1(-1370.58,-1735.43) 1(-1370.58,-1735.3) 1(-1370.58,-1735.3) 1(-1370.56,-1735.34) 1(-1370.56,-1735.29) 1(-1370.56,-1735.27) 1(-1370.56,-1735.27) 1(-1370.55,-1735.08) 1(-1370.55,-1735.08) 1(-1370.53,-1735.34) 1(-1370.53,-1735.34) 1(-1370.51,-1735.9) 1(-1370.51,-1735.9) 1(-1370.51,-1735.5) 1(-1370.51,-1735.5) 1(-1370.51,-1735.31) 1(-1370.51,-1735.31) 1(-1370.51,-1735.12) 1(-1370.51,-1735.12)
  round 0.01 on Mech15: 1(-1373.44,-1737.33) 1(-1373.44,-1736.38) 1(-1373.35,-1735.3) 1(-1373.35,-1735.3) 1(-1373.35,-1735.29) 1(-1373.3,-1735.22) 1(-1373.3,-1735.2) 1(-1373.27,-1736.38) 1(-1373.27,-1736.38) 1(-1373.27,-1736.15) 1(-1373.27,-1736.15) 1(-1373.22,-1736.38) 1(-1373.22,-1736.15) 1(-1373.22,-1736.31) 1(-1373.22,-1736.31) 1(-1373.22,-1736.21) 1(-1373.22,-1736.21) 1(-1373.17,-1736.31) 1(-1373.17,-1736.31) 1(-1373.17,-1736.21) 1(-1373.17,-1736.21) 1(-1373.16,-1736.38) 1(-1373.16,-1736.15) 1(-1373.12,-1736.38) 1(-1373.12,-1736.38) 1(-1373.12,-1736.15) 1(-1373.12,-1736.15) 1(-1373.09,-1737.64) 1(-1373.09,-1737.63) 1(-1373.09,-1737.63) 1(-1373.04,-1736.05) 1(-1373.04,-1737.56) 1(-1373.04,-1737.54) 1(-1373.04,-1736.05) 1(-1373.03,-1736.05) 1(-1373.02,-1738.06) 1(-1372.91,-1736.05) 1(-1372.9,-1736.05) 1(-1372.9,-1736.05) 1(-1372.77,-1736.05) 1(-1372.77,-1736.05) 1(-1372.76,-1736.05) 1(-1372.73,-1737.06) 1(-1372.73,-1737.04) 1(-1372.67,-1736.97) 1(-1372.67,-1736.97) 1(-1372.67,-1736.96) 1(-1372.64,-1736.05) 1(-1372.64,-1736.05) 1(-1372.63,-1736.05) 1(-1372.57,-1735.53) 1(-1372.54,-1735.53) 1(-1372.54,-1737.63) 1(-1372.54,-1737.63) 1(-1372.54,-1737.62) 1(-1372.51,-1736.05) 1(-1372.5,-1736.05) 1(-1372.5,-1736.05) 1(-1372.48,-1737.55) 1(-1372.48,-1737.53) 1(-1372.48,-1735.58) 1(-1372.47,-1735.58) 1(-1372.47,-1735.58) 1(-1372.38,-1736.05) 1(-1372.37,-1736.05) 1(-1372.37,-1736.05) 1(-1372.24,-1736.05) 1(-1372.24,-1736.05) 1(-1372.23,-1736.05) 1(-1372.17,-1737.06) 1(-1372.17,-1737.03) 1(-1372.12,-1736.96) 1(-1372.12,-1736.96) 1(-1372.12,-1736.95) 1(-1372.12,-1734.93) 1(-1372.12,-1734.75) 1(-1372.12,-1734.75) 1(-1372.11,-1736.05) 1(-1372.11,-1736.54) 1(-1372.11,-1736.28) 1(-1372.11,-1736.05) 1(-1372.11,-1736.27) 1(-1372.11,-1736.27) 1(-1372.11,-1736.18) 1(-1372.11,-1736.18) 1(-1372.1,-1736.05) 1(-1372.1,-1735.98) 1(-1372.1,-1735.98) 1(-1372.1,-1735.9) 1(-1372.1,-1735.9) 1(-1372.1,-1735.89) 1(-1372.1,-1735.89) 1(-1372.04,-1734.83) 1(-1372.04,-1734.83) 1(-1372.04,-1734.75) 1(-1372.04,-1734.75) 1(-1372.01,-1736.27) 1(-1372.01,-1736.18) 1(-1372,-1738.06) 1(-1371.99,-1737.63) 1(-1371.99,-1737.63) 1(-1371.99,-1737.62) 1(-1371.96,-1735.98) 1(-1371.96,-1735.89) 1(-1371.93,-1737.55) 1(-1371.93,-1737.53) 1(-1371.91,-1736.27) 1(-1371.91,-1736.19) 1(-1371.8,-1736.26) 1(-1371.8,-1736.18) 1(-1371.8,-1735.98) 1(-1371.8,-1735.9) 1(-1371.75,-1734.83) 1(-1371.75,-1734.83) 1(-1371.75,-1734.75) 1(-1371.75,-1734.75) 1(-1371.65,-1734.93) 1(-1371.65,-1734.75) 1(-1371.65,-1734.75) 1(-1371.65,-1734.75) 1(-1371.63,-1735.98) 1(-1371.63,-1735.89) 1(-1371.62,-1737.06) 1(-1371.62,-1737.03) 1(-1371.61,-1736.27) 1(-1371.61,-1736.19) 1(-1371.57,-1736.96) 1(-1371.57,-1736.96) 1(-1371.57,-1736.95) 1(-1371.55,-1734.93) 1(-1371.55,-1734.75) 1(-1371.55,-1734.75) 1(-1371.52,-1735.98) 1(-1371.52,-1735.89) 1(-1371.45,-1736.27) 1(-1371.45,-1736.18) 1(-1371.42,-1737.63) 1(-1371.42,-1737.63) 1(-1371.42,-1737.62) 1(-1371.36,-1737.55) 1(-1371.36,-1737.53) 1(-1371.36,-1735.98) 1(-1371.36,-1735.98) 1(-1371.36,-1735.89) 1(-1371.36,-1735.89) 1(-1371.29,-1736.27) 1(-1371.29,-1736.18) 1(-1371.29,-1735.66) 1(-1371.21,-1735.36) 1(-1371.21,-1735.35) 1(-1371.21,-1735.35) 1(-1371.15,-1736.27) 1(-1371.15,-1736.18) 1(-1371.09,-1736.54) 1(-1371.06,-1736.27) 1(-1371.06,-1736.27) 1(-1371.06,-1736.18) 1(-1371.06,-1736.18) 1(-1371.05,-1737.06) 1(-1371.05,-1737.03) 1(-1371,-1736.97) 1(-1371,-1736.96) 1(-1371,-1736.96) 1(-1370.95,-1735.3) 1(-1370.95,-1735.29) 1(-1370.95,-1735.29) 1(-1370.72,-1737.29) 1(-1370.72,-1738.23)
  round 0.01 on Mech6: 1(-1373.44,-1737.33) 1(-1373.44,-1736.38) 1(-1373.02,-1738.06) 1(-1372.11,-1736.54) 1(-1372.11,-1736.28) 1(-1372,-1738.06) 1(-1371.29,-1735.66) 1(-1371.09,-1736.54) 1(-1370.72,-1737.29) 1(-1370.72,-1738.23)
  round 0.01 on Mech16: 1(-1373.42,-1735.15) 1(-1373.42,-1735.15) 1(-1373.42,-1735.07) 1(-1373.42,-1735.07) 1(-1373.42,-1735.6) 1(-1373.42,-1735.6) 1(-1373.42,-1735.52) 1(-1373.42,-1735.52) 1(-1373.32,-1735.15) 1(-1373.32,-1735.07) 1(-1373.31,-1735.6) 1(-1373.31,-1735.52) 1(-1373.25,-1735.15) 1(-1373.25,-1735.07) 1(-1373.25,-1735.6) 1(-1373.25,-1735.52) 1(-1373.17,-1735.15) 1(-1373.17,-1735.15) 1(-1373.17,-1735.07) 1(-1373.17,-1735.07) 1(-1373.17,-1735.6) 1(-1373.17,-1735.6) 1(-1373.17,-1735.52) 1(-1373.17,-1735.52) 1(-1371.42,-1736.12) 1(-1371.42,-1736.04) 1(-1371.42,-1736.04) 1(-1371.42,-1735.87) 1(-1371.42,-1735.87) 1(-1371.42,-1735.79) 1(-1371.42,-1735.72) 1(-1371.42,-1735.62) 1(-1371.42,-1735.62) 1(-1371.42,-1736.29) 1(-1371.42,-1736.29) 1(-1371.42,-1736.18) 1(-1371.34,-1735.72) 1(-1371.34,-1735.62) 1(-1371.34,-1735.62) 1(-1371.34,-1736.29) 1(-1371.34,-1736.29) 1(-1371.34,-1736.18) 1(-1371.34,-1736.12) 1(-1371.34,-1736.04) 1(-1371.34,-1736.04) 1(-1371.34,-1735.87) 1(-1371.34,-1735.87) 1(-1371.34,-1735.79) 1(-1371.29,-1736.24) 1(-1371.29,-1735.95) 1(-1371.28,-1736.24) 1(-1371.28,-1735.95) 1(-1371.28,-1736.24) 1(-1371.28,-1735.95) 1(-1371.25,-1735.67) 1(-1371.25,-1735.67) 1(-1371.25,-1735.59) 1(-1371.25,-1735.59) 1(-1371.17,-1735.67) 1(-1371.17,-1735.59) 1(-1371.11,-1735.67) 1(-1371.11,-1735.59) 1(-1371.01,-1735.67) 1(-1371.01,-1735.67) 1(-1371.01,-1735.59) 1(-1371.01,-1735.59) 1(-1370.99,-1735.67) 1(-1370.99,-1735.67) 1(-1370.99,-1735.59) 1(-1370.99,-1735.59) 1(-1370.99,-1735.58) 1(-1370.99,-1735.58) 1(-1370.99,-1735.42) 1(-1370.99,-1735.42) 1(-1370.89,-1735.67) 1(-1370.89,-1735.59) 1(-1370.83,-1735.67) 1(-1370.83,-1735.59) 1(-1370.75,-1735.58) 1(-1370.75,-1735.58) 1(-1370.75,-1735.42) 1(-1370.75,-1735.42) 1(-1370.75,-1735.67) 1(-1370.75,-1735.67) 1(-1370.75,-1735.59) 1(-1370.75,-1735.59)
  round 0.24 on Mech15: 1(-1373.38,-1735.8)
  round 0.26 on Mech5: 1(-1373.38,-1735.8)
  round 0.24 on Mech6: 1(-1373.38,-1735.8)